# Altium PCB current sink.PcbDoc (part 2 of 2)
Units mm, origin at the board's own origin, x right, y up, seen from the top; angles counter-clockwise.
Board outline 128.91 x 103.89 mm, 2 copper layers (Top Layer, Bottom Layer); 147 components, 85 nets, 489 pads, 208 vias.
Unrouted connection lines stored in the file: 1.
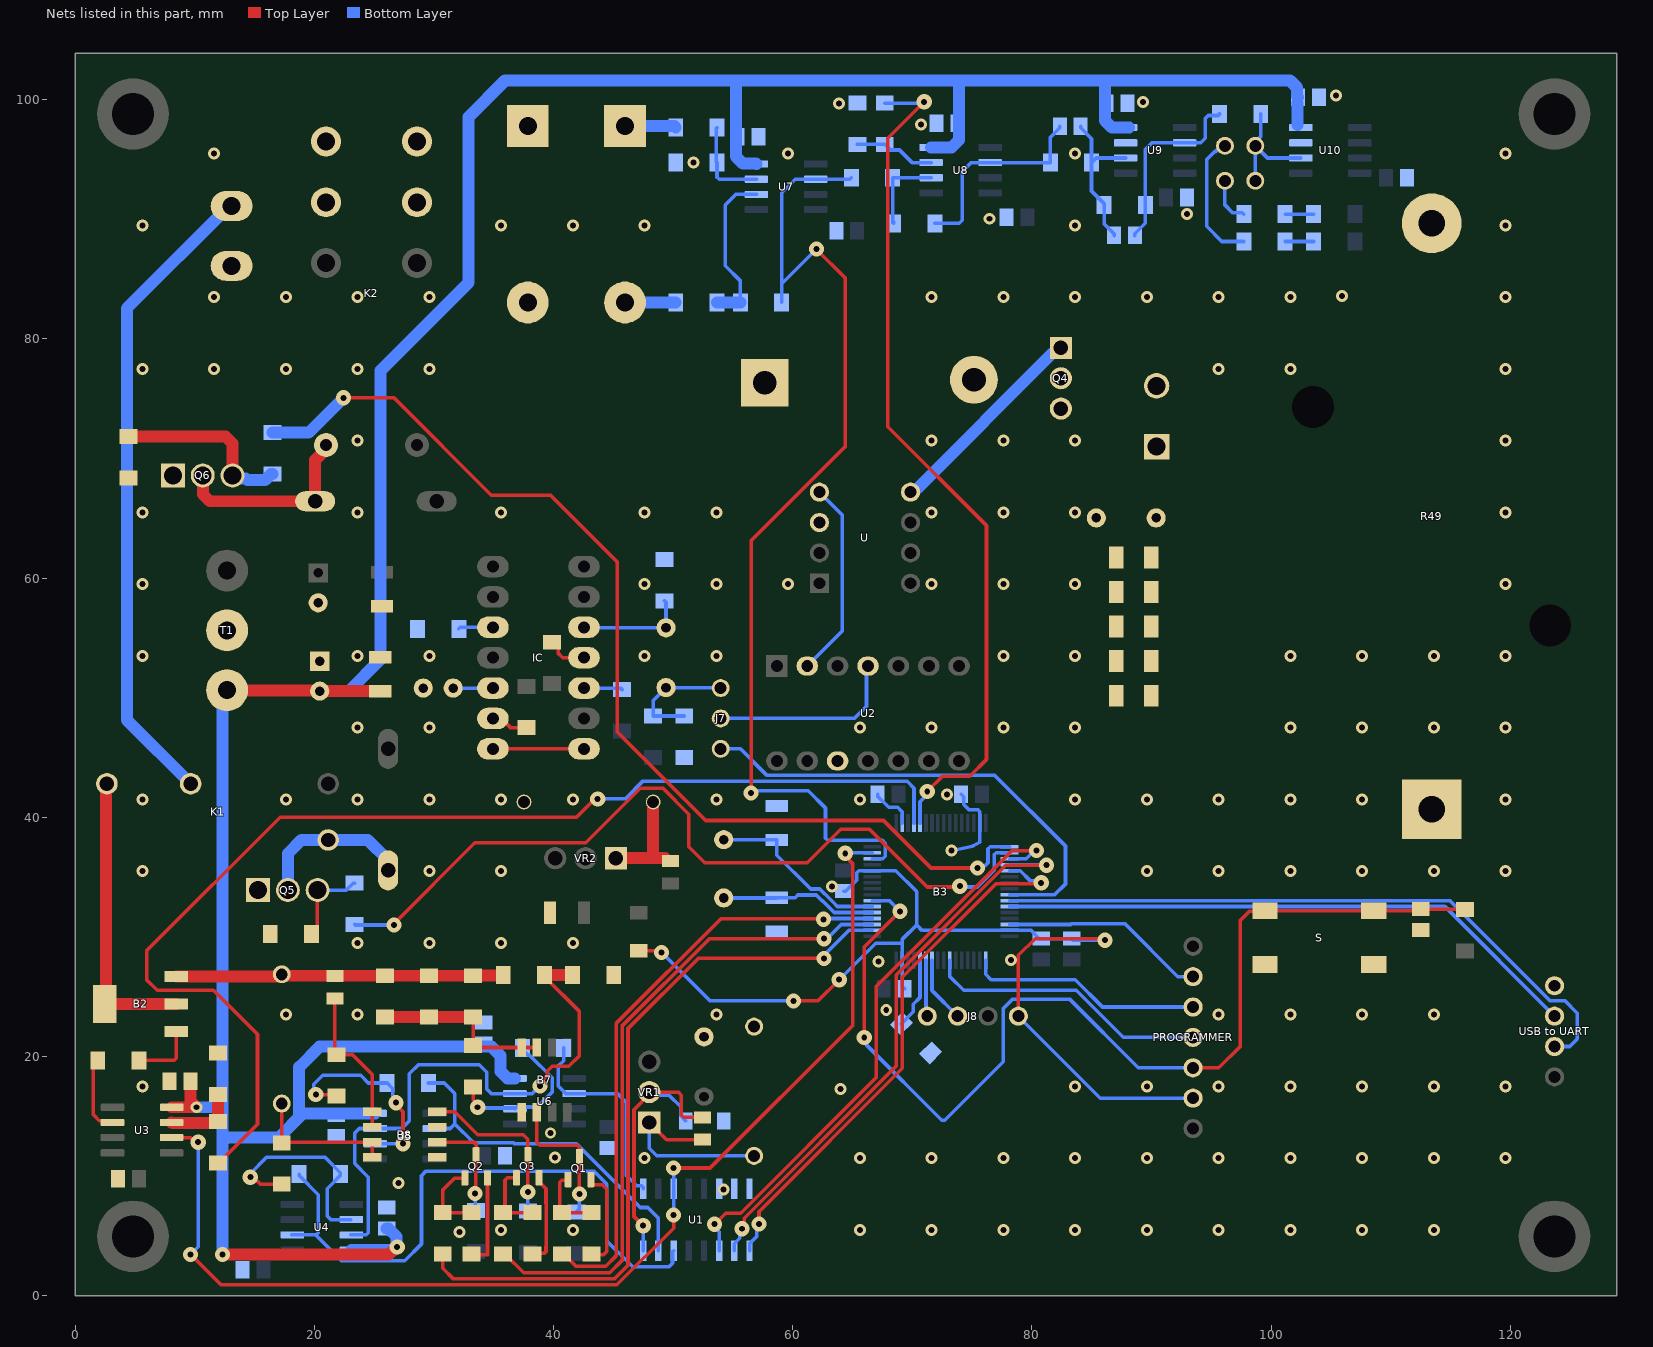
[diagram p2: the nets of this part, all layers, seen from the top]

## Via types
v1: diameter 1, hole 0.5, Top Layer to Bottom Layer, tented both sides, 156 vias
v2: diameter 1.27, hole 0.5, Top Layer to Bottom Layer, tented both sides, 51 vias
v3: diameter 0.9, hole 0.5, Top Layer to Bottom Layer, tented both sides, 1 vias

## Nets (pads, with @x,y where several pads share a name; then routed paths per layer and width w, separated by ;. In a path a pad name is that pad's centre, name@x,y a point inside that pad or via, vN(x,y) a via of type N, cw(c..) or ccw(c..) an arc to the next point about the centre after c; other vN are vias at no path point) (continued)
-15: C8.1 c16.2 C31.1 C32.1 C33.1 C34.1 C39.1 C40.1 C41.1 C42.1 T1.3 U3.4 U4.4 U5.4 U6.4 U7.4 U8.4 U9.4 U10.4 | length 275.4
  Top Layer w1: U3.4@8.058,15.748 v1(10.16,15.748) 9.634,16.274 C39.1@9.634,17.907 ; v2(12.319,3.429) 26.216,3.429 26.851,4.064 v2(26.924,4.064) ; T1.3@12.7,50.626 12.74,50.586 20.407,50.586 c16.2@20.447,50.546 C8.1@25.504,50.546
  Bottom Layer w1: v1(10.16,15.748) 12.319,15.748 ; v2(12.319,3.429) 12.319,12.876 ; T1.3@12.7,50.626 12.319,50.245 12.319,15.748 ; 18.718,14.908 18.718,15.454 18.722,15.457 18.722,16.334 18.718,16.337 18.718,19.099 20.447,20.828 34.798,20.828 35.56,20.066 35.56,18.747 36.146,18.161 U6.4@36.773,18.161 ; c16.2@20.447,50.546 22.86,50.546 25.527,53.213 25.527,77.343 32.893,84.709 32.893,98.552 35.941,101.6 55.245,101.6 ; U4.4@23.101,3.81 v2@26.597,3.81 ; U5.4@25.089,15.24 21.844,15.24 19.05,15.24 17.018,13.208 12.651,13.208 12.319,12.876 ; C40.1@26.035,5.606 26.185,5.606 26.872,4.919 26.872,4.116 v2(26.924,4.064) ; U7.4@56.966,94.615 56.917,94.664 55.831,94.664 55.245,95.25 55.245,101.6 ; U8.4@71.571,96.012 73.279,96.012 73.914,96.647 73.914,101.6 ; U9.4@88.138,97.663 U9.4@87.827,97.663 86.692,97.663 86.106,98.249 86.106,101.6 ; U10.4@102.199,97.863 C33.1@102.199,99.731 ; C33.1@102.253,100.203 102.168,100.288 102.168,101.014 101.582,101.6 86.106,101.6 ; 12.319,12.876 12.319,15.748 ; 55.245,101.6 73.914,101.6 ; 73.914,101.6 86.106,101.6
adc1: B3.14 R29.2 R36.2 U7.6 | length 86.2
  Top Layer w0.3: v2(56.515,42.037) 56.515,63.119 64.389,70.993 64.389,85.09 v2(61.976,87.503)
  Bottom Layer w0.3: v2(56.515,42.037) 56.695,42.217 61.288,42.217 62.738,40.767 62.738,38.245 62.914,38.069 67.497,38.069 67.74,37.827 67.74,36.737 67.534,36.532 B3.14@66.652,36.532 ; R29.2@59.076,83.058 59.076,84.603 ; v2(61.976,87.503) 59.076,84.603 ; R36.2@64.897,93.472 64.77,93.345 U7.6@61.906,93.345 60.198,93.345 59.076,92.223 59.076,84.603
common: B3.15 U1.3 U3.2 | length 97.3
  Top Layer w0.3: U3.2@8.058,13.208 9.644,13.208 10.025,12.827 v2(10.287,12.827) ; v2(9.652,3.429) 12.187,0.894 45.289,0.894 50.038,5.643 v2(50.038,6.731) ; v2(50.038,10.668) 53.086,10.668 65.032,22.614 65.032,36.089 64.389,36.732 v2(64.389,36.98)
  Bottom Layer w0.3: v2(9.652,3.429) 9.652,3.445 10.287,4.08 v2(10.287,12.827) ; v2(50.038,6.731) U1.3@50.038,8.941 v2(50.038,10.668) ; v2(64.389,36.98) 64.441,37.032 B3.15@66.652,37.032
"control signal": Q4.1 U.5 | length 17.6
  Bottom Layer w1: U.5@69.85,67.183 69.985,67.183 70.234,67.432 70.353,67.432 81.744,78.823 81.998,78.823 Q4.1@82.423,79.248
fb+: K2.1 K2.8 R39.2 R43.0 R44.0 | length 4.3
  Bottom Layer w1: R44.0@45.974,97.79 50.093,97.79 50.218,97.665 R39.2@50.218,97.663
fb-: L1.1 R35.2 R43.1 R44.1 | length 4.3
  Bottom Layer w1: R44.1@45.974,83.04 45.983,83.049 50.209,83.049 R35.2@50.218,83.058
GND: "IC LEAD.2" "USB to UART.4" B3.12 B3.18 B3.31 B3.47 B3.63 B7.1 B8.1 B8.3 C1.1 C2.1 C3.1 C6.1 C7.1 C8.2 C9.1 c10.2 C11.1 C13.1 C14.2 C15.2 c16.1 C17.2 C18.2 C19.2 C20.2 C21.2 C22.2 C23.1 C24.1 C25.1 C26.1 C27.2 C28.2 C29.2 C30.2 C31.2 C32.2 C33.2 C34.2 C35.2 C36.2 C37.2 C38.2 C39.2 C40.2 C41.2 C42.2 C43.2 J8.4 PROGRAMMER.6 Q1.2 Q2.2 Q3.2 Q4.3 Q5.1 Q6.1 R3.1 R4.2 R13.2 R23.1 R25.1 R27.1 R41.1 R42.2 R45.2 R48.2 R49.1 R51.2 R52.1 R53.2 R58.1 R60.2 S.1 S.2 T1.2 U1.6 U1.7 U1.8 U2.12 U9.3 U10.3 U.3 | length 123.9
  Top Layer w0.3: R25.1@33.147,3.482 33.2,3.429 34.479,3.429 34.479,7.724 ; 34.478,7.725 Q2.2@34.478,9.815 ; R27.1@38.227,3.482 38.301,3.556 39.243,3.556 39.37,3.683 39.37,4.064 39.381,4.075 39.381,7.724 39.37,7.735 39.37,8.942 38.796,9.516 Q3.2@38.796,9.851 ; Q1.2@43.114,9.688 43.114,9.427 43.259,9.282 44.058,9.282 44.45,8.89 44.45,3.683 44.196,3.429 43.233,3.429 R23.1@43.18,3.482 ; C9.1@47.117,28.829 48.9,28.829 v2(49.034,28.694) ; v2(60.071,24.638) 62.103,24.638 v2(63.881,26.416) ; J8.4@78.867,23.368 78.867,28.448 80.264,29.845 85.979,29.845 v2(86.106,29.718)
  Bottom Layer w0.3: v2(49.034,28.694) 53.091,24.638 v2(60.071,24.638) ; v2(63.881,26.416) 66.929,29.464 69.14,29.464 ; C21.2@64.262,33.818 64.412,33.818 65.347,34.753 65.347,35.356 65.523,35.532 B3.12@66.652,35.532 68.608,35.532 70.358,33.782 70.358,30.988 ; C19.2@67.092,41.91 67.092,41.76 68.027,40.825 68.776,40.825 69.14,40.461 B3.18@69.14,39.52 ; C20.2@69.342,25.654 69.14,25.856 B3.63@69.14,28.044 69.14,29.464 ; v1(73.279,37.211) 75.057,37.592 75.64,37.921 B3.31@75.64,39.52 75.64,40.464 75.464,40.64 74.725,40.64 74.295,41.07 74.295,41.692 C17.2@74.077,41.91 ; J8.4@78.867,23.368 85.725,16.51 PROGRAMMER.6@93.472,16.51 ; C18.2@80.622,29.845 79.935,30.532 B3.47@78.128,30.532 73.787,30.532 70.814,30.532 70.358,30.988 ; C18.2@80.772,29.845 C22.2@83.312,29.845 83.439,29.718 v2(86.106,29.718) ; 69.14,29.464 69.14,29.77 70.358,30.988
  other v1: 32.131,5.334 35.616,5.489 41.616,5.489 65.616,5.489 71.616,5.489 77.616,5.489 83.616,5.489 89.616,5.489 95.616,5.489 101.616,5.489 107.616,5.489 113.616,5.489 54.229,8.89 27.051,9.398 47.616,11.489 65.616,11.489 71.616,11.489 77.616,11.489 83.616,11.489 89.616,11.489 95.616,11.489 101.616,11.489 107.616,11.489 113.616,11.489 119.616,11.489 40.132,11.557 64.008,17.272 5.616,17.489 83.616,17.489 89.616,17.489 95.616,17.489 101.616,17.489 107.616,17.489 113.616,17.489 119.616,17.489 17.616,23.489 23.616,23.489 53.616,23.489 95.616,23.489 101.616,23.489 107.616,23.489 113.616,23.489 67.818,23.876 67.183,27.94 78.232,28.067 23.616,29.489 29.616,29.489 35.616,29.489 41.616,29.489 63.276,34.193 5.616,35.489 29.616,35.489 35.616,35.489 89.616,35.489 95.616,35.489 101.616,35.489 107.616,35.489 113.616,35.489 119.616,35.489 5.616,41.489 17.616,41.489 23.616,41.489 29.616,41.489 35.616,41.489 41.616,41.489 53.616,41.489 65.616,41.489 83.616,41.489 89.616,41.489 95.616,41.489 101.616,41.489 107.616,41.489 119.616,41.489 72.898,41.91 23.616,47.489 29.616,47.489 65.616,47.489 71.616,47.489 77.616,47.489 83.616,47.489 101.616,47.489 107.616,47.489 113.616,47.489 119.616,47.489 5.616,53.489 23.616,53.489 29.616,53.489 47.616,53.489 53.616,53.489 77.616,53.489 83.616,53.489 101.616,53.489 107.616,53.489 113.616,53.489 119.616,53.489 5.616,59.489 47.616,59.489 53.616,59.489 59.616,59.489 71.616,59.489 77.616,59.489 83.616,59.489 119.616,59.489 5.616,65.489 23.616,65.489 35.616,65.489 47.616,65.489 53.616,65.489 71.616,65.489 77.616,65.489 83.616,65.489 119.616,65.489 23.616,71.489 71.616,71.489 77.616,71.489 83.616,71.489 119.616,71.489 5.616,77.489 11.616,77.489 17.616,77.489 23.616,77.489 29.616,77.489 95.616,77.489 101.616,77.489 119.616,77.489 11.616,83.489 17.616,83.489 23.616,83.489 29.616,83.489 71.616,83.489 77.616,83.489 83.616,83.489 89.616,83.489 95.616,83.489 101.616,83.489 119.616,83.489 105.918,83.566 5.616,89.489 35.616,89.489 41.616,89.489 47.616,89.489 83.616,89.489 119.616,89.489 76.454,90.043 92.964,90.424 51.689,94.742 11.616,95.489 59.616,95.489 83.616,95.489 119.616,95.489 70.739,97.917 63.881,99.695 89.281,99.822 105.41,100.33
  other v3: 39.751,13.589
"I2C scl": B3.58 J8.2 | length 5.6
  Bottom Layer w0.3: B3.58@71.64,28.044 71.64,25.515 J8.2@73.787,23.368
"I2C sda": B3.59 J8.1 | length 4.7
  Bottom Layer w0.3: B3.59@71.14,28.044 71.14,23.475 J8.1@71.247,23.368
"IC pin": "IC LEAD.1" K1.2 K2.2 K2.7 | length 54.3
  Bottom Layer w1: K1.2@9.652,42.799 4.318,48.133 4.318,82.55 12.874,91.106 13.081,91.106
in-opamp: B7.7 B7.8 R9.1 R10.1 R11.1 R17.1 | length 15.2
  Top Layer w0.3: R11.1@33.274,23.294 R17.1@33.274,20.902 33.43,20.746 B7.8@37.338,20.746 B7.7@38.608,20.746
  Top Layer w1: R9.1@25.908,23.294 R10.1@29.591,23.294 R11.1@33.274,23.294
"input ic 1": B2.2 B2.4 K1.3 | length 24.5
  Top Layer w1: K1.3@2.652,42.799 2.557,42.704 2.557,24.48 B2.4@2.461,24.384 B2.2@8.461,24.384
"micro1 10mA": B3.2 R24.1 | length 61.3
  Top Layer w0.3: R24.1@30.734,3.482 30.734,2.286 31.626,1.394 45.082,1.394 46.226,2.538 46.226,22.333 52.087,28.194 v2(62.611,28.194)
  Bottom Layer w0.3: v2(62.611,28.194) 62.611,28.451 64.692,30.532 B3.2@66.652,30.532
"micro2 250mA": B3.3 R26.2 | length 55.1
  Top Layer w0.3: R26.2@35.789,3.482 35.914,3.482 37.497,1.899 44.698,1.899 45.726,2.927 45.726,22.54 53.031,29.845 v2(62.611,29.845)
  Bottom Layer w0.3: v2(62.611,29.845) 62.865,29.845 64.052,31.032 B3.3@66.652,31.032
"micro3 1A": B3.4 R22.2 | length 49.8
  Top Layer w0.3: R22.2@40.716,3.482 40.841,3.482 41.87,2.453 44.363,2.453 45.226,3.316 45.226,22.747 53.975,31.496 62.543,31.496 v2(62.577,31.462)
  Bottom Layer w0.3: v2(62.577,31.462) 62.647,31.532 B3.4@66.652,31.532
micro4: B3.35 U1.11 | length 49.2
  Top Layer w0.3: v2(53.467,5.969) 54.389,6.891 55.642,6.891 66.968,18.217 66.968,25.837 78.342,37.211 v2(80.391,37.211)
  Bottom Layer w0.3: v2(53.467,5.969) 53.467,5.707 53.848,5.326 U1.11@53.848,3.759 ; B3.35@78.128,36.532 79.536,36.532 80.215,37.211 v2(80.391,37.211)
micro5: B3.36 U1.10 | length 48.1
  Top Layer w0.3: v2(55.751,5.59) 55.937,5.776 55.937,6.479 68.668,19.21 68.668,26.83 77.82,35.982 81.2,35.982 v2(81.206,35.988)
  Bottom Layer w0.3: U1.10@55.118,3.759 55.118,4.343 55.565,4.791 55.565,5.404 v2(55.751,5.59) ; B3.36@78.128,36.032 81.162,36.032 v2(81.206,35.988)
micro6: B3.37 U1.9 | length 46.1
  Top Layer w0.3: v2(57.17,5.974) 57.176,5.98 57.176,7.011 69.168,19.003 69.168,26.623 76.993,34.448 80.703,34.448 v2(80.772,34.517)
  Bottom Layer w0.3: U1.9@56.388,3.759 56.388,4.343 56.984,4.94 56.984,5.789 v2(57.17,5.974) ; B3.37@78.128,35.532 79.01,35.532 79.84,34.703 80.586,34.703 v2(80.772,34.517)
"micro7 0-1": B3.21 R40.2 | length 72
  Top Layer w0.3: v2(70.993,99.822) 67.945,96.774 67.945,72.644 76.2,64.389 76.2,44.831 74.803,43.434 72.517,43.434 v2(71.247,42.164)
  Bottom Layer w0.3: R40.2@67.691,99.716 70.887,99.716 v2(70.993,99.822) ; B3.21@70.64,39.52 70.64,41.295 71.247,41.902 v2(71.247,42.164)
micro8: B3.34 R47.2 | length 68.9
  Top Layer w0.3: v2(26.67,30.988) 26.67,31.115 33.411,37.856 42.682,37.856 47.244,42.418 49.149,42.418 51.308,40.259 51.308,37.52 52.633,36.195 61.214,36.195 64.008,38.989 66.421,38.989 71.247,34.163 73.901,34.163 v2(73.971,34.233)
  Bottom Layer w0.3: R47.2@23.368,31.041 23.421,30.988 v2(26.67,30.988) ; v2(73.971,34.233) 74.041,34.163 75.438,34.163 76.835,35.56 76.835,36.856 77.011,37.032 B3.34@78.128,37.032
micro9: B3.33 R50.2 | length 88.9
  Top Layer w0.3: v2@22.512,75.07 26.657,75.07 34.793,66.934 39.746,66.934 45.334,61.346 45.334,47.122 52.731,39.725 67.59,39.725 71.56,35.755 v2(75.438,35.755)
  Top Layer w1: v2(22.439,75.07) v2@22.512,75.07
  Bottom Layer w0.3: v2(75.438,35.755) 75.624,35.94 76.072,35.94 76.327,36.195 76.327,37.356 76.503,37.532 B3.33@78.128,37.532
  Bottom Layer w1: R50.2@16.51,72.157 19.526,72.157 v2(22.439,75.07)
"micro10 dac sawtooth": B3.41 J7.1 | length 40.4
  Bottom Layer w0.3: J7.1@53.975,45.72 55.626,45.72 57.851,43.495 76.901,43.495 82.804,37.592 82.804,34.417 81.919,33.532 B3.41@78.128,33.532
"micro continous": B3.20 R1.1 | length 99
  Top Layer w0.3: R1.1@11.938,11.102 12.063,11.102 12.538,11.577 12.538,11.635 15.24,14.337 15.24,21.844 11.557,25.527 6.858,25.527 5.966,26.419 5.966,28.826 17.145,40.005 41.91,40.005 43.434,41.529 v2(43.688,41.529)
  Bottom Layer w0.3: v2(43.688,41.529) 45.984,41.529 47.477,43.022 57.617,43.022 57.644,42.995 69.564,42.995 70.14,42.419 B3.20@70.14,39.52
NetB2_1: B2.1 R2.2 | length 5.4
  Top Layer w0.3: R2.2@5.334,19.685 8.285,19.685 8.461,19.861 B2.1@8.461,22.084
NetB2_3: B2.3 R5.1 R7.2 R8.2 R9.2 R10.2 R11.2 | length 27.5
  Top Layer w1: B2.3@8.461,26.684 17.023,26.684 17.207,26.868 R7.2@17.272,26.868 17.337,26.868 17.461,26.744 21.717,26.744 R9.2@25.908,26.744 R10.2@29.591,26.744 R11.2@33.274,26.744 33.3,26.771 35.766,26.771 R5.1@35.793,26.797
NetB3_5: B3.5 C14.1 Y1.2 | length 13.1
  Bottom Layer w0.3: Y1.2@54.229,33.247 58.647,33.247 C14.1@58.674,33.274 60.202,33.274 60.425,33.497 61.965,33.497 62.442,33.02 62.484,33.02 63.472,32.032 B3.5@66.652,32.032
NetB3_6: B3.6 C15.1 Y1.1 | length 15.5
  Bottom Layer w0.3: Y1.1@54.229,38.127 C15.1@58.674,38.127 ; C15.1@58.674,38.1 58.674,36.83 61.507,33.997 62.269,33.997 63.177,33.089 63.382,32.883 ; 63.383,32.883 63.734,32.532 B3.6@66.652,32.532
NetB3_60: B3.60 R60.1 | length 6
  Bottom Layer w0.3: R60.1@69.088,22.733 70.076,23.721 70.076,24.356 70.64,24.92 B3.60@70.64,28.044
NetB7_2: B7.2 Q1.3 R21.1 | length 11.7
  Top Layer w0.3: B7.2@38.608,15.322 38.608,12.827 38.862,12.573 41.988,12.573 42.164,12.397 Q1.3@42.164,11.648 v2(42.164,8.503)
  Bottom Layer w0.3: R21.1@41.91,6.985 42.164,7.239 v2(42.164,8.503)
NetB8_2: B8.2 Q2.3 R18.1 | length 9
  Top Layer w0.3: B8.2@30.271,12.827 33.401,12.827 33.528,12.7 Q2.3@33.528,11.775 33.484,11.731 33.484,8.584 v2(33.439,8.539)
  Bottom Layer w0.3: v2(33.439,8.539) 33.439,7.222 R18.1@33.528,7.133
NetB8_4: B8.4 Q3.3 R19.1 | length 14.5
  Top Layer w0.3: B8.4@30.271,15.367 31.75,15.367 33.655,13.462 37.465,13.462 37.846,13.081 Q3.3@37.846,11.811 v2(37.846,8.666)
  Bottom Layer w0.3: R19.1@37.846,7.059 v2(37.846,8.666)
NetB8_5: B8.5 B8.6 R8.1 R15.1 | length 12.9
  Top Layer w0.3: R8.1@21.717,24.892 21.717,20.267 R15.1@21.844,20.14 23.188,20.14 24.847,18.481 B8.5@24.847,15.367 B8.6@24.847,14.097
NetB8_7: B8.7 B8.8 R6.1 R7.1 | length 12.2
  Top Layer w0.3: R7.1@17.272,16.058 R6.1@17.272,12.774 17.325,12.827 B8.7@24.847,12.827 B8.8@24.847,11.557
NetC2_2: C2.2 R14.2 U1.16 VR1.2 | length 24.9
  Top Layer w0.3: v2(47.498,5.842) 46.726,6.614 46.726,15.553 48.006,16.833 VR1.2@48.006,17.018 50.419,17.018 50.673,16.764 50.673,15.113 50.881,14.905 R14.2@52.451,14.905
  Bottom Layer w0.3: U1.16@47.498,3.759 v2(47.498,5.842) ; VR1.2@48.006,17.018 48.26,16.764 49.657,16.764 50.629,15.792 50.629,15.03 C2.2@51.054,14.605
NetC4_1: C4.1 C5.2 R28.2 R37.1 U9.2 | length 13.3
  Bottom Layer w0.3: C5.2@84.074,97.79 84.074,97.64 84.984,96.73 R37.1@84.984,94.742 ; C4.1@86.868,88.646 86.868,88.796 86.032,89.632 R28.2@86.032,91.186 86.032,91.311 84.984,92.359 R37.1@84.984,94.742 ; U9.2@87.827,95.123 85.365,95.123 R37.1@84.984,94.742
NetC4_2: C4.2 R28.1 R38.2 U9.6 | length 15.9
  Bottom Layer w0.3: C4.2@88.61,88.646 88.61,88.796 89.482,89.668 R28.1@89.482,91.186 89.482,95.832 90.043,96.393 U9.6@92.767,96.393 94.107,96.393 94.488,96.774 94.488,98.425 94.742,98.679 95.557,98.679 R38.2@95.684,98.806
NetC5_1: C5.1 R30.1 R37.2 U8.6 | length 17.5
  Bottom Layer w0.3: R30.1@71.882,89.662 73.914,89.662 74.168,89.916 74.168,93.98 74.93,94.742 U8.6@76.511,94.742 R37.2@81.534,94.742 81.534,96.842 82.332,97.64 C5.1@82.332,97.79
NetC6_2: C6.2 C7.2 C23.2 C24.2 C25.2 C26.2 D1.1 R49.0
NetC11_2: C11.2 IC.10 | length 3.3
  Bottom Layer w0.3: C11.2@31.603,50.8 IC.10@34.925,50.8
NetC12_1: C12.1 IC.3 R52.2 | length 9.2
  Bottom Layer w0.3: IC.3@42.545,55.88 42.565,55.86 49.383,55.86 C12.1@49.403,55.84 49.403,57.965 R52.2@49.276,58.092
NetC12_2: C12.2 J7.3 R57.1 R58.2 | length 10
  Bottom Layer w0.3: R58.2@50.927,48.461 R57.1@48.323,48.461 48.323,49.76 C12.2@49.403,50.84 49.423,50.82 53.955,50.82 J7.3@53.975,50.8
NetD1_2: D1.2 L1.2 Q4.2
NetIC_4: IC.4 R54.2 | length 3.5
  Top Layer w0.3: R54.2@39.878,54.631 39.9,54.631 40.375,54.156 40.375,53.732 40.767,53.34 IC.4@42.545,53.34
NetIC_5: IC.5 R55.2 | length 3.2
  Bottom Layer w0.3: IC.5@42.545,50.8 45.593,50.8 R55.2@45.72,50.673
NetIC_7: IC.7 IC.8 | length 7.6
  Top Layer w0.3: IC.8@34.925,45.72 IC.7@42.545,45.72
NetIC_9: IC.9 R56.2 | length 3.1
  Top Layer w0.3: IC.9@34.925,48.26 35.632,48.26 36.394,47.498 R56.2@37.719,47.498
NetIC_12: IC.12 R53.1 | length 2.9
  Bottom Layer w0.3: R53.1@32.078,55.753 32.205,55.88 IC.12@34.925,55.88
NetJ2_1: 3.3.1 5.1 R38.1 U10.2 | length 10
  Bottom Layer w0.3: 5.1@98.679,93.218 3.3.1@98.679,96.139 ; R38.1@99.134,98.806 99.134,96.919 98.679,96.464 3.3.1@98.679,96.139 ; U10.2@102.489,95.123 99.695,95.123 3.3.1@98.679,96.139
NetJ2_2: 5.2 R31.2 | length 3.9
  Bottom Layer w0.3: 5.2@96.139,93.218 96.139,91.186 96.774,90.551 97.589,90.551 R31.2@97.716,90.424
NetJ3_2: 3.3.2 R33.2 | length 11.2
  Bottom Layer w0.3: 3.3.2@96.139,96.139 95.814,96.139 95.306,95.631 95.25,95.631 94.615,94.996 94.615,89.408 95.885,88.138 R33.2@97.716,88.138
NetJ5_A: J5.A K1.4 Q5.2 | length 13.4
  Bottom Layer w0.3: K1.4@21.151,38.1 K1.4@21.152,38.099
  Bottom Layer w1: Q5.2@17.78,33.909 17.78,36.957 18.923,38.1 K1.4@21.151,38.1 ; K1.4@21.152,38.099 24.461,38.099 26.162,36.398 J5.A@26.162,35.56
NetJ6_A: J6.A K2.4 Q6.2 | length 16.2
  Top Layer w1: Q6.2@10.668,68.58 10.668,67.007 11.254,66.421 J6.A@20.066,66.421 20.066,69.537 20.066,69.87 K2.4@21.145,70.949
NetQ1_1: Q1.1 R22.1 R23.2 | length 5.9
  Top Layer w0.3: Q1.1@41.214,9.688 41.178,9.652 40.689,9.652 40.513,9.476 40.513,7.135 R22.1@40.716,6.932 R23.2@43.18,6.932
NetQ2_1: Q2.1 R24.2 R25.2 | length 6.6
  Top Layer w0.3: Q2.1@32.578,9.815 31.714,9.815 30.734,8.835 R24.2@30.734,6.932 R25.2@33.147,6.932
NetQ3_1: Q3.1 R26.1 R27.2 | length 6.3
  Top Layer w0.3: Q3.1@36.896,9.851 36.14,9.851 35.941,9.652 35.941,7.084 R26.1@35.789,6.932 R27.2@38.227,6.932
NetQ5_3: Q5.3 R47.1 R48.1 | length 7.2
  Top Layer w0.3: R48.1@19.759,30.226 20.234,30.701 20.234,33.873 Q5.3@20.27,33.909
  Bottom Layer w0.3: Q5.3@20.27,33.909 22.661,33.909 23.243,34.491 R47.1@23.368,34.491
NetQ6_3: Q6.3 R50.1 R51.1 | length 15.3
  Top Layer w1: R51.1@4.445,71.829 12.572,71.829 13.158,71.243 Q6.3@13.158,68.58
  Bottom Layer w1: Q6.3@13.158,68.58 13.407,68.331 14.262,68.331 14.394,68.199 15.877,68.199 16.385,68.707 R50.1@16.51,68.707
NetR1_2: R1.2 R3.2 U3.3 | length 6.2
  Top Layer w1: U3.3@8.058,14.478 8.123,14.413 11.674,14.413 11.813,14.552 R1.2@11.938,14.552 R3.2@11.938,16.817
NetR2_1: R2.1 U3.6 | length 6.6
  Top Layer w0.3: R2.1@1.884,19.672 1.524,19.312 1.524,15.113 2.009,14.628 2.968,14.628 U3.6@3.118,14.478
NetR4_1: R4.1 R5.2 U4.3 U5.3 U6.3 | length 47.6
  Top Layer w0.3: v2(38.862,17.526) 38.862,17.788 39.472,18.398 39.472,18.771 39.878,19.177 41.275,19.177 42.164,20.066 42.164,23.751 39.243,26.672 R5.2@39.243,26.797
  Top Layer w1: R5.2@39.243,26.797 R4.1@41.582,26.797
  Bottom Layer w0.3: U4.3@23.044,5.08 24.335,5.08 24.511,5.256 24.511,9.906 23.368,11.049 23.368,13.589 23.749,13.97 U5.3@25.089,13.97 27.305,13.97 27.94,14.605 27.94,18.542 28.702,19.304 33.782,19.304 33.908,19.178 34.417,18.669 34.417,17.272 34.798,16.891 38.211,16.891 38.846,17.526 v2(38.862,17.526)
NetR6_2: R6.2 R12.1 U4.2 | length 18
  Top Layer w0.3: v2(14.639,9.902) 14.901,9.902 15.479,9.324 R6.2@17.272,9.324
  Bottom Layer w0.3: v2(14.639,9.902) 14.639,10.194 16.002,11.557 20.906,11.557 20.955,11.508 20.955,11.502 22.172,10.285 R12.1@22.172,10.16 22.172,10.035 21.082,8.945 21.082,6.858 21.085,6.855 21.085,6.653 21.387,6.35 U4.2@23.044,6.35
NetR12_2: R12.2 U1.14 U4.6 | length 52.4
  Bottom Layer w0.3: U4.6@18.104,5.08 20.095,5.08 ; R12.2@18.722,10.16 18.722,10.035 20.32,8.437 20.32,5.256 20.144,5.08 20.095,5.08 ; U1.14@50.038,3.759 49.944,3.665 49.944,2.7 49.657,2.413 46.609,2.413 44.45,4.572 44.45,9.326 43.362,10.414 29.337,10.414 28.956,10.033 28.956,4.318 27.544,2.906 22.269,2.906 20.095,5.08
NetR13_1: R13.1 R14.1 VR1.1 | length 16.2
  Top Layer w0.3: VR1.1@48.006,14.478 49.449,13.035 R14.1@52.451,13.035
  Bottom Layer w0.3: VR1.1@48.006,14.478 48.006,12.319 48.641,11.684 R13.1@56.769,11.684
NetR15_2: R15.2 R16.1 U5.2 | length 17.4
  Top Layer w0.3: v2(20.116,16.806) 21.728,16.806 R15.2@21.844,16.69 ; v2(26.828,16.129) 26.828,15.963 27.41,15.381 v2(27.41,12.7)
  Bottom Layer w0.3: v2(20.116,16.806) 19.952,16.97 19.952,17.666 20.701,18.415 23.876,18.415 24.511,17.78 R16.1@26.088,17.78 26.563,17.305 26.563,16.656 26.828,16.391 v2(26.828,16.129) ; U5.2@25.089,12.7 v2(27.41,12.7)
NetR16_2: R16.2 U1.15 U5.6 | length 30
  Bottom Layer w0.3: R16.2@29.538,17.78 30.861,17.78 31.75,16.891 31.75,14.351 ; U5.6@30.029,13.97 31.369,13.97 31.75,14.351 ; U1.15@48.768,3.759 48.768,6.477 47.879,7.366 47.244,7.366 41.91,12.7 36.722,12.7 36.653,12.769 33.332,12.769 31.75,14.351
NetR17_2: R17.2 R20.1 U6.2 | length 13.5
  Top Layer w0.3: R17.2@33.274,17.452 33.274,16.377 33.655,15.996 v2(33.655,15.748)
  Bottom Layer w0.3: v2(33.655,15.748) 33.718,15.684 36.709,15.684 U6.2@36.773,15.621 36.923,15.771 38.631,15.771 39.878,17.018 39.878,18.214 37.991,20.101 37.866,20.101 37.391,20.576 R20.1@37.391,20.701
NetR20_2: R20.2 U1.1 U6.6 | length 17.7
  Bottom Layer w0.3: R20.2@40.841,20.701 40.841,19.632 40.378,19.169 40.378,17.541 41.028,16.891 45.339,16.891 46.101,16.129 46.101,10.033 46.957,9.177 47.381,9.177 47.498,9.06 U1.1@47.498,8.941
NetR29_1: R29.1 R35.1 U7.2 | length 13.6
  Bottom Layer w0.3: R29.1@55.626,83.058 55.626,84.836 54.356,86.106 54.356,91.186 55.245,92.075 U7.2@56.966,92.075
  Bottom Layer w1: R35.1@53.668,83.058 R29.1@55.626,83.058
NetR30_2: R30.2 R36.1 U8.2 | length 7.2
  Bottom Layer w0.3: R30.2@68.432,89.787 R30.2@68.432,89.662 68.347,89.747 R36.1@68.347,93.472 U8.2@71.571,93.472
NetR31_1: R31.1 R32.2 | length 2.4
  Bottom Layer w0.3: R31.1@101.166,90.424 R32.2@103.558,90.424
NetR33_1: R33.1 R34.2 | length 2.4
  Bottom Layer w0.3: R33.1@101.166,88.138 R34.2@103.558,88.138
NetR39_1: R39.1 R41.2 U7.3 | length 7.5
  Bottom Layer w0.3: R41.2@53.668,94.729 53.668,93.521 53.844,93.345 U7.3@56.966,93.345 ; R41.2@53.668,94.742 53.615,94.795 53.615,97.61 R39.1@53.668,97.663
NetR40_1: R40.1 R42.1 U8.3 | length 6.8
  Bottom Layer w0.3: R42.1@65.405,96.266 R40.1@67.691,96.266 68.166,95.791 68.928,95.791 69.977,94.742 U8.3@71.571,94.742
NetR45_1: R45.1 R46.1 VR2.1 | length 9.4
  Top Layer w1: VR2.1@45.212,36.576 48.387,36.576 ; R45.1@48.331,41.275 48.331,36.632 48.387,36.576 ; R46.1@49.784,36.322 49.574,36.322 49.32,36.576 48.387,36.576
NetU2_2: U2.2 U.4 | length 16.5
  Bottom Layer w0.3: U2.2@61.214,52.644 64.135,55.565 64.135,65.278 U.4@62.23,67.183
NRST: B3.7 C43.1 PROGRAMMER.5 R59.1 S.3 S.4 | length 88.7
  Top Layer w0.3: v2(65.978,21.59) 65.978,29.148 v2(68.961,32.131) ; PROGRAMMER.5@93.472,19.05 95.631,19.05 97.409,20.828 97.409,31.369 98.161,32.121 99.42,32.121 S.4@99.485,32.186 S.3@108.585,32.186 112.395,32.186 C43.1@112.522,32.313 116.165,32.313 R59.1@116.205,32.273
  Bottom Layer w0.3: v2(65.978,21.59) 66.164,21.404 66.164,20.958 72.456,14.666 72.705,14.666 77.597,19.558 77.597,24.003 78.359,24.765 83.185,24.765 88.9,19.05 PROGRAMMER.5@93.472,19.05 ; B3.7@66.652,33.032 68.06,33.032 v2(68.961,32.131)
RXD: "USB to UART.3" B3.43 | length 49.4
  Bottom Layer w0.3: B3.43@78.128,32.532 114.534,32.532 123.698,23.368
sawtooth: J7.2 U2.4 | length 16
  Bottom Layer w0.3: J7.2@53.975,48.26 65.151,48.26 66.167,49.276 66.167,52.517 U2.4@66.294,52.644
SYS_JTMS_SWCLK: B3.49 PROGRAMMER.3 | length 19.6
  Bottom Layer w0.3: B3.49@76.14,28.044 76.14,26.857 76.581,26.416 83.612,26.416 85.898,24.13 PROGRAMMER.3@93.472,24.13
SYS_JTMS_SWDIO: B3.46 PROGRAMMER.2 | length 17.2
  Bottom Layer w0.3: B3.46@78.128,31.032 83.226,31.032 83.278,31.084 87.788,31.084 92.202,26.67 PROGRAMMER.2@93.472,26.67
SYS_JTMS_TRACESWO: B3.55 PROGRAMMER.4 | length 23.8
  Bottom Layer w0.3: B3.55@73.14,28.044 73.14,26.682 74.295,25.527 83.693,25.527 87.63,21.59 PROGRAMMER.4@93.472,21.59
TXD: "USB to UART.2" B3.42 | length 55.7
  Bottom Layer w0.3: B3.42@78.128,33.032 114.948,33.032 123.342,24.638 124.587,24.638 125.603,23.622 125.603,21.463 124.968,20.828 123.698,20.828
pads on no net: B3.8 B3.9 B3.10 B3.11 B3.16 B3.17 B3.22 B3.23 B3.24 B3.25 B3.26 B3.27 B3.28 B3.29 B3.30 B3.38 B3.39 B3.40 B3.44 B3.45 B3.50 B3.51 B3.52 B3.53 B3.54 B3.56 B3.57 B3.61 B3.62 B7.3 B7.4 B7.5 B7.6 IC.1 IC.2 IC.11 IC.13 IC.14 K2.3 K2.6 PROGRAMMER.7 R49.3 Screw1.1 Screw2.1 Screw3.1 Screw4.1 U1.2 U1.4 U1.5 U1.12 U1.13 U2.1 U2.6 U2.7 U2.8 U2.9 U2.10 U2.11 U2.13 U2.14 U3.1 U3.5 U3.8 U4.1 U4.5 U4.8 U5.1 U5.5 U5.8 U6.1 U6.5 U6.8 U7.1 U7.5 U7.8 U8.1 U8.5 U8.8 U9.1 U9.5 U9.8 U10.1 U10.5 U10.8 U.1 U.2 U.7 U.8

## Polygon pours and split planes (outlines as drawn)
GND on Top Layer "GND_L01_P012" (solid, pour order 12): 0.381,57.023 0.381,100.33 cw(c2.921,100.33) 2.921,102.87 125.857,102.87 cw(c125.857,100.33) 128.397,100.33 128.397,3.175 cw(c125.857,3.175) 125.857,0.635 3.175,0.635 cw(c3.175,3.175) 0.635,3.175 0.635,8.636
NetD1_2 on Top Layer "NETD1_2_L01_P006" (solid, pour order 6): 76.2,80.518 ccw(c76.813,80.518) 76.38,80.084 78.232,78.232 ccw(c79.458,79.458) 79.458,77.724 91.409,77.724 cw(c91.409,76.423) 92.329,77.343 cw(c91.409,76.423) 92.71,76.423 92.71,75.184 cw(c92.097,75.184) 92.53,74.75 92.329,74.549 cw(c92.022,74.856) 92.022,74.422 86.487,74.422 cw(c86.487,76.262) 85.186,74.961 84.709,75.438 ccw(c84.402,75.131) 84.402,75.565 80.554,75.565 ccw(c80.554,73.025) 78.758,74.821 77.597,73.66 cw(c76.371,74.886) 76.371,73.152 72.263,73.152 cw(c72.263,75.298) 70.745,73.781 70.104,74.422 cw(c71.024,75.342) 69.723,75.342 69.723,79.121 cw(c72.176,79.121) 70.441,80.855 70.993,81.407 cw(c71.606,80.794) 71.606,81.661 75.184,81.661 cw(c75.184,80.435) 76.051,81.302 76.2,81.153
NetC6_2 on Top Layer "NETC6_2_L01_P007" (solid, pour order 7): 88.55,71.78 cw(c88.244,71.474) 88.677,71.473 88.55,48.768 ccw(c90.247,49.471) 89.544,47.773 97.13,47.95 ccw(c96.863,47.785) 97.028,48.051 97.948,48.768 ccw(c95.018,50.88) 98.583,51.459 98.583,71.644 ccw(c96.416,71.645) 97.948,73.177 ccw(c97.029,72.259) 97.028,73.558 89.544,73.558 ccw(c89.544,72.692) 88.931,73.304 ccw(c89.543,72.691) 88.677,72.691 88.677,71.653
NetC6_2 on Top Layer "NETC6_2_L01_P010" (solid, pour order 10): 106.934,97.754 cw(c109.474,97.754) 107.678,99.55 108.47,100.342 cw(c110.272,98.552) 110.272,101.092 115.266,101.092 cw(c115.28,98.552) 117.076,100.348 117.743,99.681 cw(c115.951,97.881) 118.491,97.881 118.491,61.377 cw(c115.951,61.377) 117.747,59.581 117.457,59.291 cw(c115.661,61.087) 115.661,58.547 95.206,58.547 cw(c95.206,60.281) 93.98,59.055 cw(c95.206,60.281) 93.472,60.281 93.472,68.798 cw(c96.012,68.798) 94.216,70.594 94.742,71.12 cw(c96.275,69.587) 96.275,71.755 106.934,71.755
fb+ on Top Layer "Top Layer-fb-" (solid, pour order 0): 48.224,94.996 ccw(c48.224,97.536) 50.02,95.74 50.165,95.885 ccw(c49.552,96.498) 50.419,96.498 50.419,99.949 ccw(c48.273,99.949) 49.79,101.467 49.276,101.981 ccw(c48.05,100.755) 48.05,102.489 18.451,102.489 ccw(c18.451,99.949) 16.655,101.745 16.383,101.473 ccw(c16.69,101.166) 16.256,101.166 16.256,96.222 ccw(c17.99,96.222) 16.764,94.996
"IC pin" on Top Layer "IC_PIN_L01_P002" (solid, pour order 2): 9.652,94.107 31.242,94.107 cw(c31.242,92.267) 32.543,93.568 32.639,93.472 cw(c31.719,92.552) 33.02,92.552 33.02,91.821 cw(c30.874,91.821) 32.391,90.303 32.131,90.043 cw(c30.905,91.269) 30.905,89.535 9.561,89.535 cw(c9.561,92.075) 7.765,90.279 7.62,90.424 cw(c8.54,91.344) 7.239,91.344 7.239,92.456 cw(c9.385,92.456) 7.868,93.974 7.874,93.98
fb- on Top Layer "FB-_L01_P004" (solid, pour order 4): 34.671,85.852 60.289,85.852 cw(c60.289,83.312) 62.085,85.108 62.357,84.836 cw(c60.824,83.303) 62.992,83.303 62.992,71.918 cw(c60.452,71.918) 62.248,70.122 62.23,70.104 cw(c61.004,71.33) 61.004,69.596 34.961,69.596 cw(c34.961,72.136) 33.165,70.34 32.639,70.866 cw(c33.252,71.479) 32.385,71.479 32.385,84.499 cw(c34.119,84.499) 32.893,85.725
GND on Bottom Layer "GND_L02_P013" (solid, pour order 13): 0.254,61.341 0.254,100.711 cw(c2.794,100.711) 2.794,103.251 125.857,103.251 cw(c125.857,100.711) 128.397,100.711 128.397,3.175 cw(c125.857,3.175) 125.857,0.635 2.921,0.635 cw(c2.921,3.175) 0.381,3.175 0.381,10.668

## Keep-outs
Keep-Out Layer:
  lines w0.254: 0,0 0,103.886 0.381,103.886 128.905,103.886 128.905,0 0,0

## Silkscreen, mask and mechanical layers (free items; w line width, h text height)
Top Overlay:
  drawing of 28 lines, arcs and shapes, not listed
  text "GND" at 11.138,81.551 h2
  text "+15" at 11.684,63.881 h1.52
  text "-15" at 15.748,47.244 h1.52 r180
  text "RST" at 101.854,24.638 h1.52
  text "CURRENT SINK" at 96.648,7.112 h2.5
  text "FAZLOLLAH POUR" at 97.683,4.519 h2.5
  text "SUMMER 1403" at 99.85,1.926 h2.5

## Text inside footprints (layer, text, board x,y; h text height)
"IC LEAD": Top Overlay "1 2" at 4.445,91.821 h2.5 r270
K1: Mechanical 13 "*" at 24.549,43.375 h1.27 r270
R49: Top Overlay "res 2.2 ohm" at 97.917,73.533 h1.52 r90
T1: Top Overlay "1 2 3" at 4.064,61.341 h2.5 r270